# Altium PCB 封装.pcbdoc
Units mil, origin at the board's own origin, x right, y up, seen from the top; angles counter-clockwise.
Board outline 2830 x 1941.92 mil, 4 copper layers (Top Layer, Inner1, Inner2, Bottom Layer); 3 components, 89 nets, 100 pads, 0 vias.
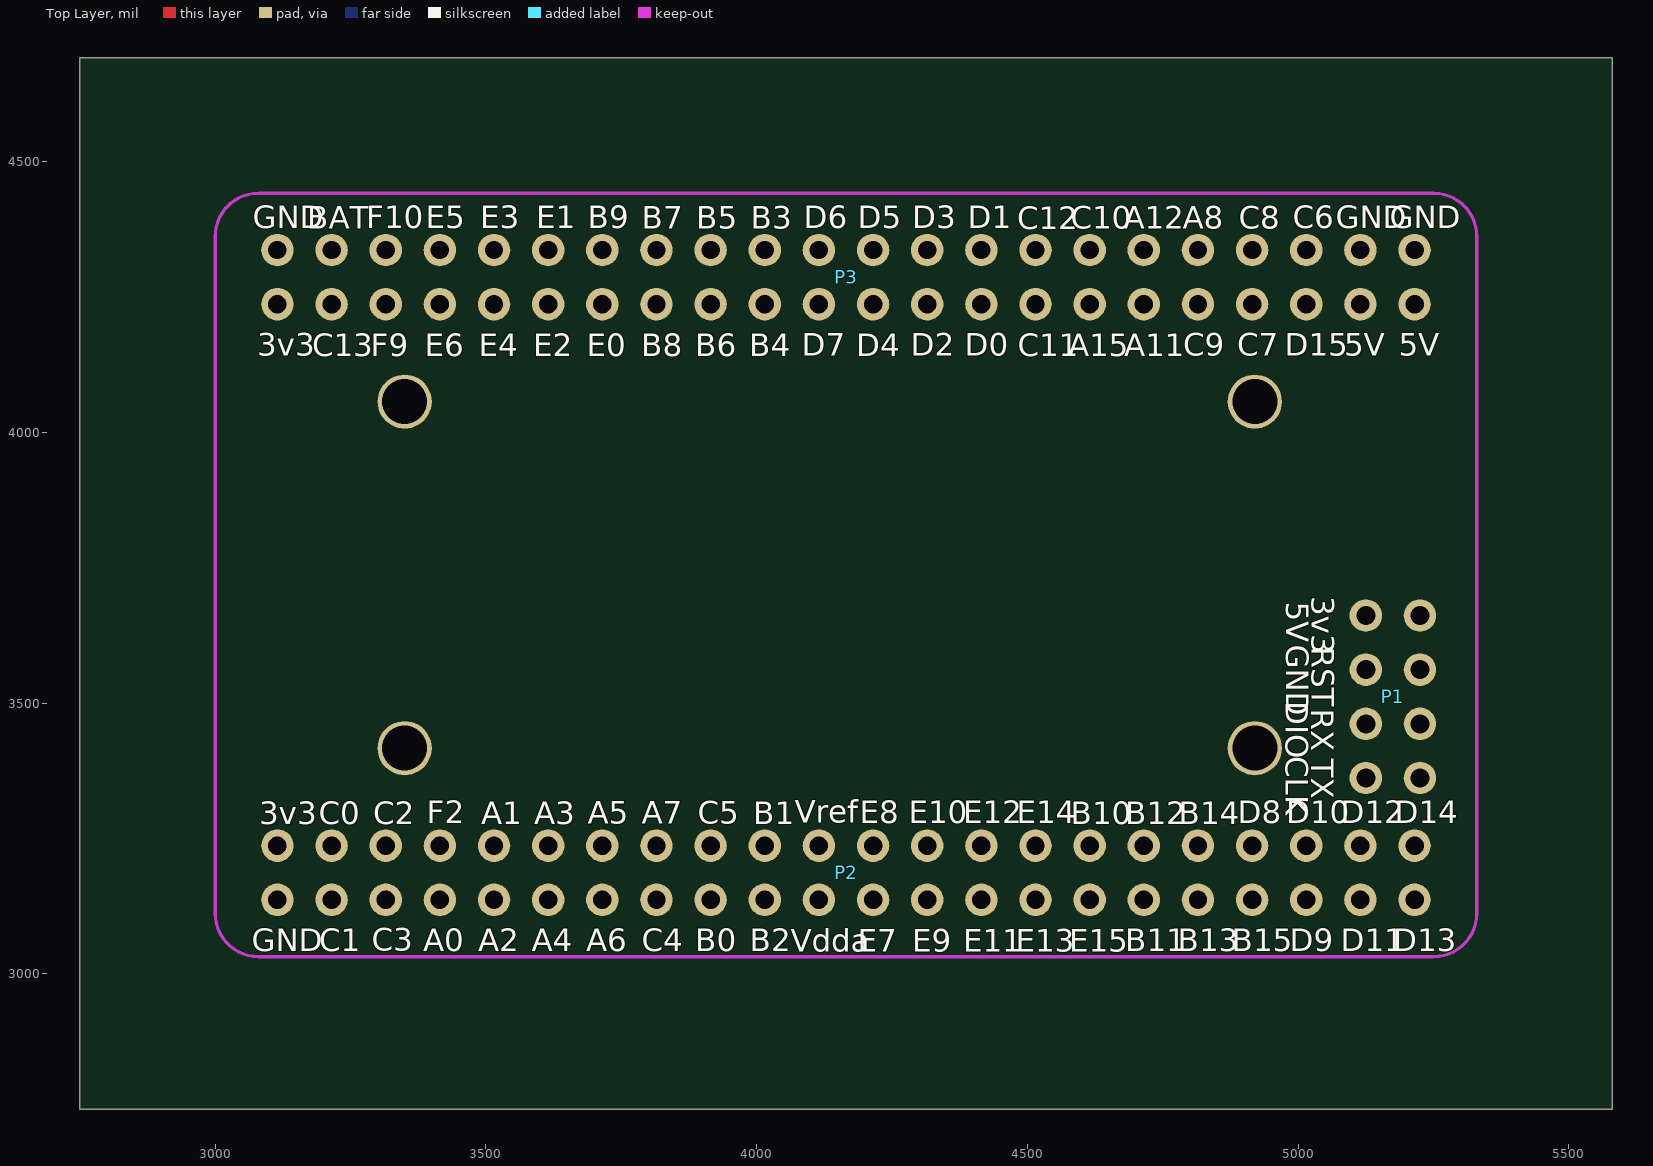
[diagram p0: Top Layer view]
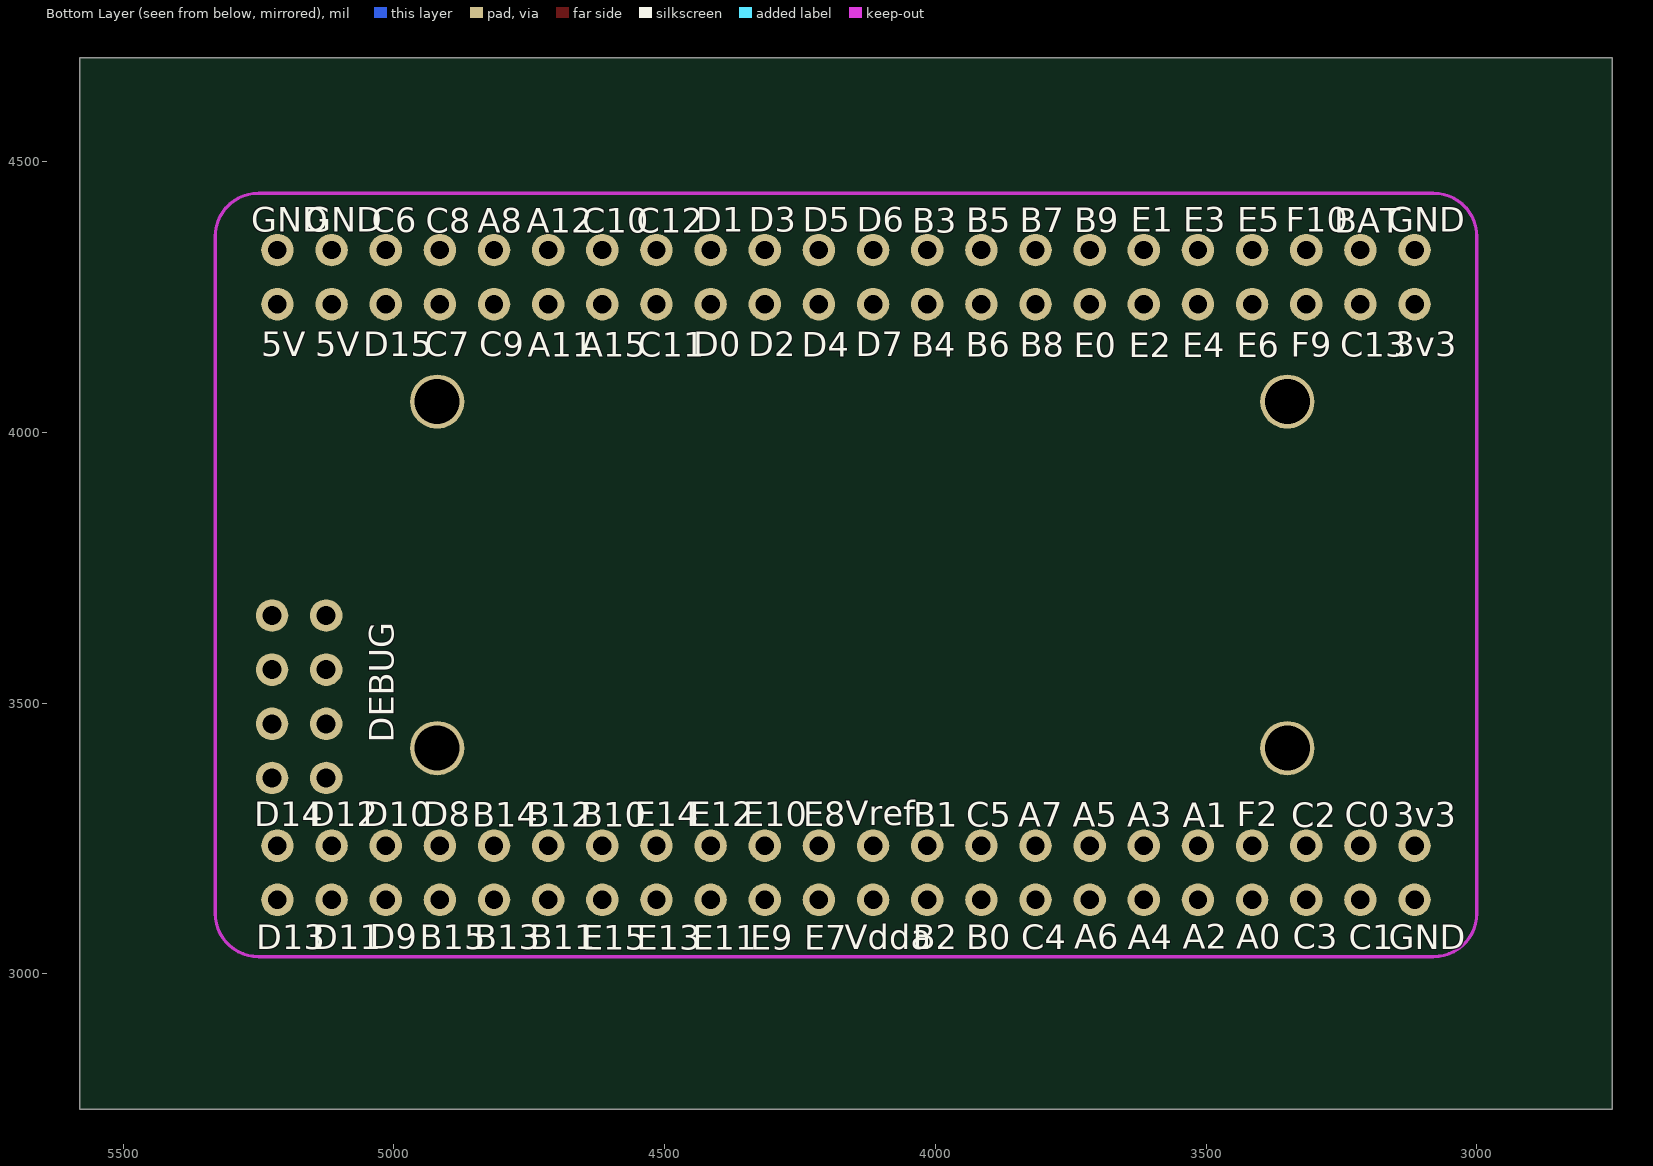
[diagram p1: Bottom Layer view, seen from below]

## Layer stack, top to bottom
Top Layer: signal copper (thickness not stored)
Dielectric: dielectric 12.6, FR-4, Dk 4.8
Inner1: signal copper (thickness not stored)
Dielectric: dielectric 12.6, FR-4, Dk 4.8
Inner2: signal copper (thickness not stored)
Dielectric: dielectric 12.6, FR-4, Dk 4.8
Bottom Layer: signal copper (thickness not stored)

## Board outline
5580,2750 2750,2750 2750,4691.92 5580,4691.92

## Components (designator, comment, footprint, x,y, rotation, side; value= is the part's Value field where it differs from the comment)
P1 "Header-Male-2.54_2x4" "header 2*4" 5225,3361.92 r90 top
P2 "Header 2x22" "Header 2x22" 4165,3186.92 r90 top
P3 "Header 2x22" "Header 2x22" 4165,4286.92 r90 top

## Footprints (in the part's own frame and the unit in brackets; to place one, negate y for a bottom-side part, rotate by r counter-clockwise, add the part's x,y. Pads: shape width x height; smd on the part's side, far side on the other; paste and mask are expansions set on the pad)
"header 2*4" [mil]
  round 60 hole 35: 1(0,0) 2(0,100) 3(100,0) 4(100,100) 5(200,0) 6(200,100) 7(300,0) 8(300,100)
"Header 2x22" [mil]
  round 60 hole 34: 1(-50,1050) 2(50,1050) 3(-50,950) 4(50,950) 5(-50,850) 6(50,850) 7(-50,750) 8(50,750) 9(-50,650) 10(50,650) 11(-50,550) 12(50,550) 13(-50,450) 14(50,450) 15(-50,350) 16(50,350) 17(-50,250) 18(50,250) 19(-50,150) 20(50,150) 21(-50,50) 22(50,50) 23(-50,-50) 24(50,-50) 25(-50,-150) 26(50,-150) 27(-50,-250) 28(50,-250) 29(-50,-350) 30(50,-350) 31(-50,-450) 32(50,-450) 33(-50,-550) 34(50,-550) 35(-50,-650) 36(50,-650) 37(-50,-750) 38(50,-750) 39(-50,-850) 40(50,-850) 41(-50,-950) 42(50,-950) 43(-50,-1050) 44(50,-1050)

## Free pads (board coordinates)
  round 100 hole 83: 1(3350,3416.92) 1(3350,4056.92) 1(4920,3416.92) 1(4920,4056.92)

## Nets (pads, with @x,y where several pads share a name; then routed paths per layer and width w, separated by ;. In a path a pad name is that pad's centre, name@x,y a point inside that pad or via, vN(x,y) a via of type N, cw(c..) or ccw(c..) an arc to the next point about the centre after c; other vN are vias at no path point)
3V3: P1.7 P2.2 P3.1
5V: P1.8 P3.41 P3.43
BAT: P3.4
BOOT: P3.15
EXT_ADC_CH1: P2.7
EXT_ADC_CH2: P2.10
EXT_I2C_SCL: P3.38
EXT_I2C_SDA: P3.35
EXT_RX: P3.29
EXT_SPI1_MISO: P2.13
EXT_SPI1_MOSI: P2.16
EXT_SPI1_SCK: P2.14
EXT_SPI2_MISO: P2.36
EXT_SPI2_MOSI: P2.37
EXT_SPI2_SCK: P2.35
EXT_TX: P3.32
GND: P1.6 P2.1 P3.2 P3.42 P3.44 pad.1
LED1: P2.4
LED2: P2.3
LED3: P2.6
NRST: P1.5
PA2: P2.9
PA3: P2.12
PA4: P2.11
PA8: P3.36
PA9: P1.1
PA10: P1.3
PA11: P3.33
PA12: P3.34
PA13: P1.4
PA14: P1.2
PA15: P3.31
PB0: P2.17
PB1: P2.20
PB2: P2.19
PB3: P3.20
PB4: P3.19
PB5: P3.18
PB6: P3.17
PB7: P3.16
PB9: P3.14
PB10: P2.32
PB11: P2.33
PB12: P2.34
PC3: P2.5
PC4: P2.15
PC5: P2.18
PC6: P3.40
PC7: P3.37
PC12: P3.30
PC13: P3.3
PD0: P3.27
PD1: P3.28
PD2: P3.25
PD3: P3.26
PD4: P3.23
PD5: P3.24
PD6: P3.22
PD7: P3.21
PD8: P2.38
PD9: P2.39
PD10: P2.40
PD11: P2.41
PD12: P2.42
PD13: P2.43
PD14: P2.44
PD15: P3.39
PE0: P3.13
PE1: P3.12
PE2: P3.11
PE3: P3.10
PE4: P3.9
PE5: P3.8
PE6: P3.7
PE7: P2.23
PE8: P2.24
PE9: P2.25
PE10: P2.26
PE11: P2.27
PE12: P2.28
PE13: P2.29
PE14: P2.30
PE15: P2.31
PF2: P2.8
PF9: P3.5
PF10: P3.6
VDDA: P2.21
VREF: P2.22
"": 

## Keep-outs
Board Outline Layer:
  lines w6 net "": 3000,3111.92 3000,4361.92 cw(c3080,4361.92) 3080,4441.92 5250,4441.92 cw(c5250,4361.92) 5330,4361.92 5330,3111.92 cw(c5250,3111.92) 5250,3031.92 3080,3031.92 cw(c3080,3111.92) 3000,3111.92

## Silkscreen, mask and mechanical layers (free items; w line width, h text height)
Top Silkscreen Layer:
  text "GND" at 3069.56,4377.26 h42
  text "F10" at 3279.42,4377.39 h42
  text "E5" at 3389.09,4377.26 h42
  text "E3" at 3489.79,4377.26 h42
  text "E1" at 3592.72,4377.26 h42
  text "B9" at 3688.42,4377.14 h42
  text "B7" at 3787.82,4376.63 h42
  text "D6" at 4087.06,4377.26 h42
  text "D5" at 4186.61,4377.26 h42
  text "D3" at 4287.31,4377.26 h42
  text "D1" at 4390.21,4377.26 h42
  text "C6" at 4990.49,4376.75 h42
  text "GND" at 5069.56,4377.26 h42
  text "GND" at 5169.56,4377.26 h42
  text "BAT" at 3169.94,4376.25 h42
  text "B5" at 3888.46,4376.5 h42
  text "B3" at 3989.16,4376.25 h42
  text "C12" at 4481.14,4375.74 h42
  text "C10" at 4580.31,4375.99 h42
  text "A12" at 4677.99,4375.86 h42
  text "A8" at 4787.18,4376.37 h42
  text "C8" at 4890.3,4376.37 h42
  text "3v3" at 3077.55,4141.97 h42
  text "C9" at 4787.81,4141.72 h42
  text "C7" at 4887.2,4141.97 h42
  text "5V" at 5085.5,4141.59 h42
  text "5V" at 5185.5,4141.59 h42
  text "C13" at 3179.09,4141.21 h42
  text "F9" at 3286.85,4140.95 h42
  text "B8" at 3786.47,4140.95 h42
  text "B6" at 3886.66,4140.95 h42
  text "B4" at 3985.86,4140.95 h42
  text "D7" at 4083.73,4141.34 h42
  text "D4" at 4183.99,4141.21 h42
  text "D2" at 4284.88,4141.34 h42
  text "D0" at 4384.08,4141.34 h42
  text "C11" at 4481.95,4141.21 h42
  text "A15" at 4575.21,4141.21 h42
  text "A11" at 4678.83,4141.21 h42
  text "D15" at 4974.89,4141.27 h42
  text "E6" at 3387.3,4140.32 h42
  text "E4" at 3486.47,4140.32 h42
  text "E2" at 3587.39,4140.32 h42
  text "E0" at 3686.6,4140.32 h42
  text "3v3" at 5025.23,3697.92 h42 r270
  text "5V" at 4978,3687.34 h42 r270
  text "GND" at 4977.62,3607.54 h42 r270
  text "RST" at 5025.1,3603.92 h42 r270
  text "DIO" at 4977.49,3503.94 h42 r270
  text "RX" at 5024.51,3490.03 h42 r270
  text "CLK" at 4977.49,3402.34 h42 r270
  text "TX" at 5024.49,3397.19 h42 r270
  text "Vref" at 4070.37,3279.19 h42
  text "F2" at 3390.99,3278.05 h42
  text "E8" at 4190.67,3277.92 h42
  text "E10" at 4280.68,3277.92 h42
  text "E12" at 4381.48,3277.92 h42
  text "E14" at 4480.59,3277.92 h42
  text "D8" at 4888.19,3277.92 h42
  text "D10" at 4978.2,3277.92 h42
  text "D12" at 5079.03,3277.92 h42
  text "D14" at 5178.14,3277.92 h42
  text "3v3" at 3081.11,3276.9 h42
  text "C0" at 3191.12,3276.65 h42
  text "A1" at 3491.82,3276.52 h42
  text "A3" at 3588.95,3276.84 h42
  text "A5" at 3688.22,3277.15 h42
  text "A7" at 3787.62,3277.28 h42
  text "C5" at 3891.37,3277.15 h42
  text "B1" at 3993.41,3276.9 h42
  text "B10" at 4580.04,3276.9 h42
  text "B12" at 4680.87,3276.9 h42
  text "B14" at 4779.98,3276.9 h42
  text "C2" at 3291.91,3276.39 h42
  text "C3" at 3288.8,3042.51 h42
  text "GND" at 3067.61,3041.68 h42
  text "C1" at 3191.73,3041.81 h42
  text "A0" at 3384.67,3041.94 h42
  text "A2" at 3485.5,3042.32 h42
  text "A4" at 3584.6,3041.81 h42
  text "A6" at 3685.43,3041.94 h42
  text "C4" at 3787.75,3041.81 h42
  text "B0" at 3886.26,3041.55 h42
  text "B2" at 3987.02,3041.55 h42
  text "B11" at 4680.66,3041.55 h42
  text "B13" at 4777.8,3041.55 h42
  text "B15" at 4877.03,3041.55 h42
  text "D9" at 4984.6,3041.94 h42
  text "D11" at 5078.81,3041.87 h42
  text "D13" at 5175.92,3041.87 h42
  text "Vdda" at 4063.32,3041.17 h42
  text "E7" at 4186.51,3040.92 h42
  text "E9" at 4287.12,3040.92 h42
  text "E11" at 4381.3,3040.92 h42
  text "E13" at 4478.4,3040.92 h42
  text "E15" at 4577.67,3040.92 h42
Bottom Silkscreen Layer:
  text "GND" at 3163.56,4370.25 h45
  text "F10" at 3352.99,4370.39 h45
  text "E5" at 3442.62,4370.25 h45
  text "E3" at 3541.87,4370.25 h45
  text "E1" at 3638.74,4370.25 h45
  text "B9" at 3743.34,4370.12 h45
  text "B7" at 3843.99,4369.57 h45
  text "D6" at 4144.81,4370.25 h45
  text "D5" at 4245.28,4370.25 h45
  text "D3" at 4344.53,4370.25 h45
  text "D1" at 4441.43,4370.25 h45
  text "C6" at 5041.12,4369.71 h45
  text "GND" at 5163.56,4370.25 h45
  text "GND" at 5263.56,4370.25 h45
  text "BAT" at 3263.15,4369.16 h45
  text "B5" at 3943.31,4369.44 h45
  text "B3" at 4042.56,4369.16 h45
  text "C12" at 4551.15,4368.62 h45
  text "C10" at 4652.03,4368.89 h45
  text "A12" at 4754.52,4368.75 h45
  text "A8" at 4844.67,4369.3 h45
  text "C8" at 4941.33,4369.3 h45
  text "3v3" at 3153.73,4141.02 h45
  text "C9" at 4842.71,4140.82 h45
  text "C7" at 4943.36,4141.09 h45
  text "5V" at 5145.2,4140.68 h45
  text "5V" at 5245.2,4140.68 h45
  text "C13" at 3252.06,4140.27 h45
  text "F9" at 3343.74,4140 h45
  text "B8" at 3844.15,4140 h45
  text "B6" at 3943.94,4140 h45
  text "B4" at 4044.79,4140 h45
  text "D7" at 4147.08,4140.41 h45
  text "D4" at 4246.81,4140.27 h45
  text "D2" at 4345.85,4140.41 h45
  text "D0" at 4446.7,4140.41 h45
  text "C11" at 4548.99,4140.27 h45
  text "A15" at 4656.21,4140.27 h45
  text "A11" at 4752.33,4140.27 h45
  text "D15" at 5056.56,4140.34 h45
  text "E6" at 3443.26,4139.32 h45
  text "E4" at 3544.15,4139.32 h45
  text "E2" at 3643.16,4139.32 h45
  text "E0" at 3744.01,4139.32 h45
  text "DEBUG" at 5000,3426.92 h45 r270
  text "Vref" at 4165.74,3274.19 h45
  text "F2" at 3443.65,3272.96 h45
  text "E8" at 4243.99,3272.83 h45
  text "E10" at 4354.69,3272.83 h45
  text "E12" at 4453.84,3272.83 h45
  text "E14" at 4554.79,3272.83 h45
  text "D8" at 4946.65,3272.83 h45
  text "D10" at 5057.35,3272.83 h45
  text "D12" at 5156.46,3272.83 h45
  text "D14" at 5257.42,3272.83 h45
  text "3v3" at 3154.25,3271.67 h45
  text "A3" at 3645.83,3271.67 h45
  text "A5" at 3746.61,3272.01 h45
  text "A7" at 3847.26,3272.15 h45
  text "C5" at 3943.24,3272.01 h45
  text "B1" at 4041.05,3271.74 h45
  text "B10" at 4655.37,3271.74 h45
  text "B12" at 4754.49,3271.74 h45
  text "B14" at 4855.44,3271.74 h45
  text "C0" at 3243.51,3271.46 h45
  text "C2" at 3342.66,3271.19 h45
  text "A1" at 3542.76,3271.33 h45
  text "C3" at 3339.94,3046.7 h45
  text "GND" at 3162.65,3045.68 h45
  text "C1" at 3236.81,3045.95 h45
  text "A0" at 3444.38,3046.09 h45
  text "A2" at 3543.49,3046.5 h45
  text "A4" at 3644.44,3045.95 h45
  text "A6" at 3743.56,3046.09 h45
  text "C4" at 3841.07,3045.95 h45
  text "B0" at 3942.67,3045.68 h45
  text "B2" at 4041.85,3045.68 h45
  text "B11" at 4748.67,3045.68 h45
  text "B13" at 4851.74,3045.68 h45
  text "B15" at 4952.56,3045.68 h45
  text "D9" at 5044.44,3046.09 h45
  text "D11" at 5150.65,3046.02 h45
  text "D13" at 5253.75,3046.02 h45
  text "Vdda" at 4167.25,3045.27 h45
  text "E7" at 4242.4,3045 h45
  text "E9" at 4341.75,3045 h45
  text "E11" at 4447.99,3045 h45
  text "E13" at 4551.09,3045 h45
  text "E15" at 4651.88,3045 h45